# Altium PCB minimal.PcbDoc
Units mil, origin at the board's own origin, x right, y up, seen from the top; angles counter-clockwise.
Board outline not stored, 2 copper layers (Top, Bottom), stack 0 mil thick; 2 components, 2 nets, 4 pads, 0 vias.
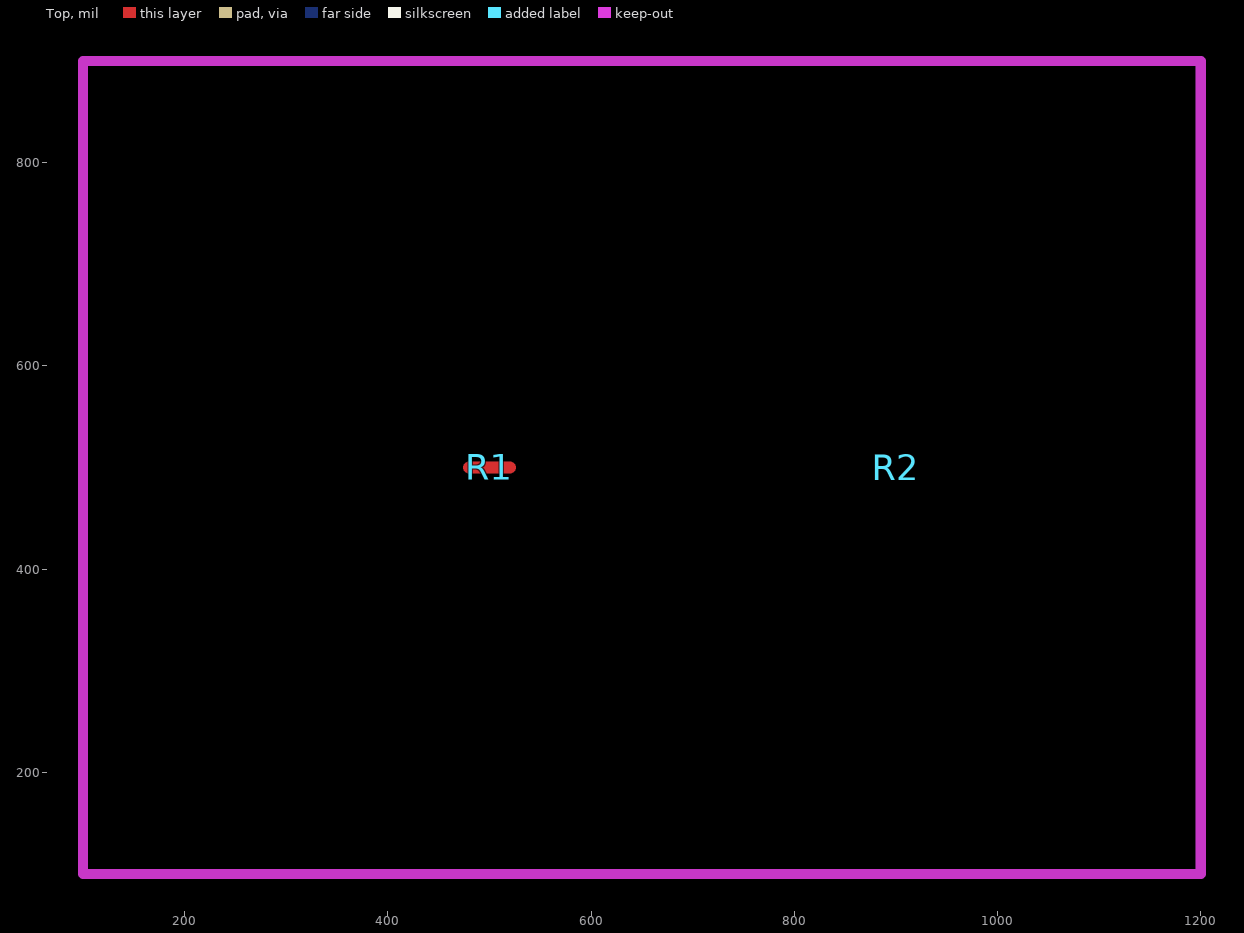
[diagram p0: Top view]
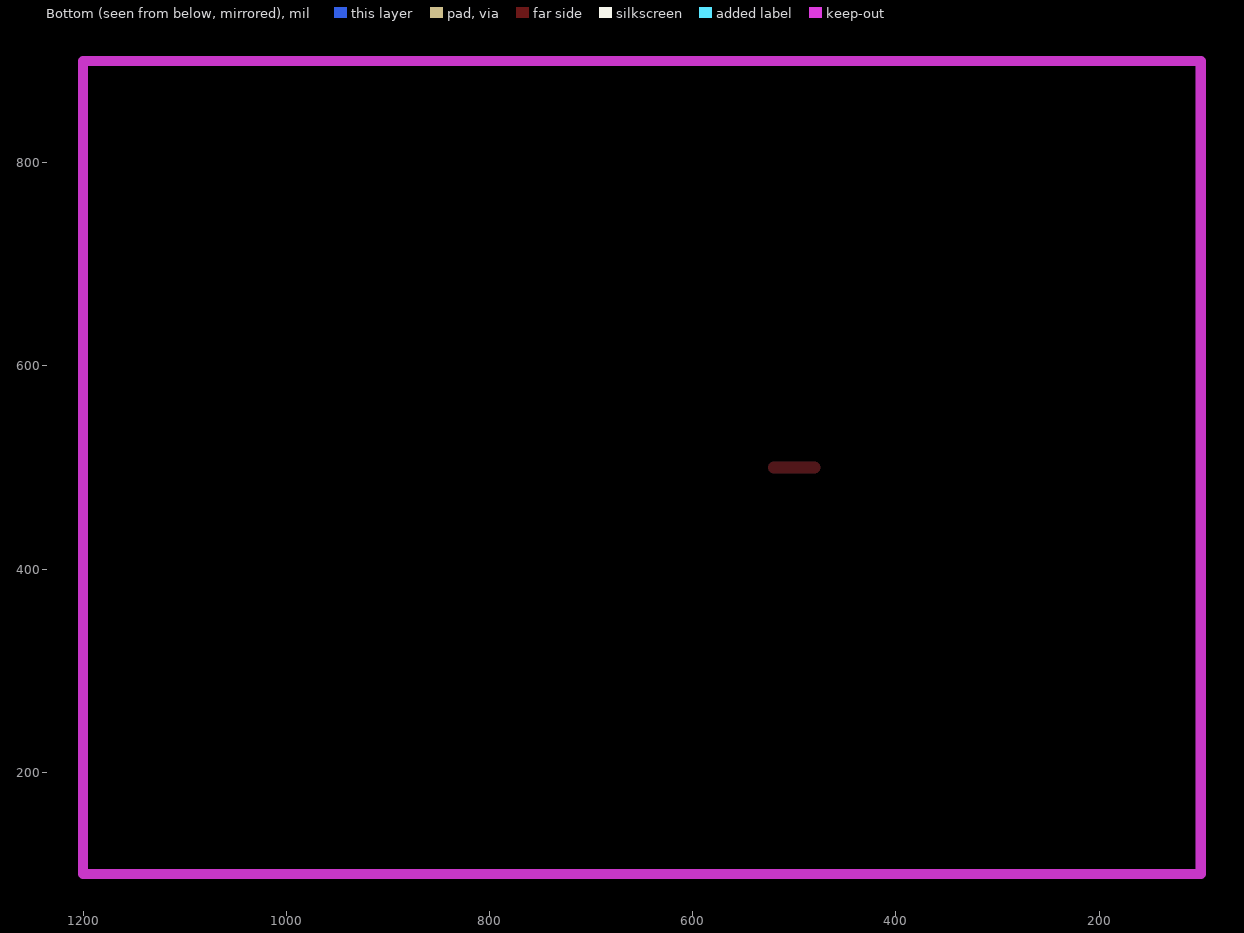
[diagram p1: Bottom view, seen from below]

## Layer stack, top to bottom

## Components (designator, comment, footprint, x,y, rotation, side; value= is the part's Value field where it differs from the comment)
R1 "" RAD-0.1 500,500 r0 top
R2 "" RAD-0.1 900,500 r0 top

## Footprints (in the part's own frame and the unit in brackets; to place one, negate y for a bottom-side part, rotate by r counter-clockwise, add the part's x,y. Pads: shape width x height; smd on the part's side, far side on the other; paste and mask are expansions set on the pad)
RAD-0.1 [mil]
  oval 60x0 on Layer0: 1(-20,0) 2(20,0)

## Nets (pads, with @x,y where several pads share a name; then routed paths per layer and width w, separated by ;. In a path a pad name is that pad's centre, name@x,y a point inside that pad or via, vN(x,y) a via of type N, cw(c..) or ccw(c..) an arc to the next point about the centre after c; other vN are vias at no path point)
GND: R2.1 R2.2
N1: R1.1 R1.2 | length 40
  Top w12: 480,500 520,500

## Keep-outs
Keep-Out:
  lines w10: 100,100 1200,100 1200,900 100,900 100,100